# Altium PCB PCB1.PcbDoc (part 2 of 2)
Units mil, origin at the board's own origin, x right, y up, seen from the top; angles counter-clockwise.
Board outline 3150 x 1810 mil, 2 copper layers (Top Layer, Bottom Layer); 95 components, 64 nets, 312 pads, 221 vias.
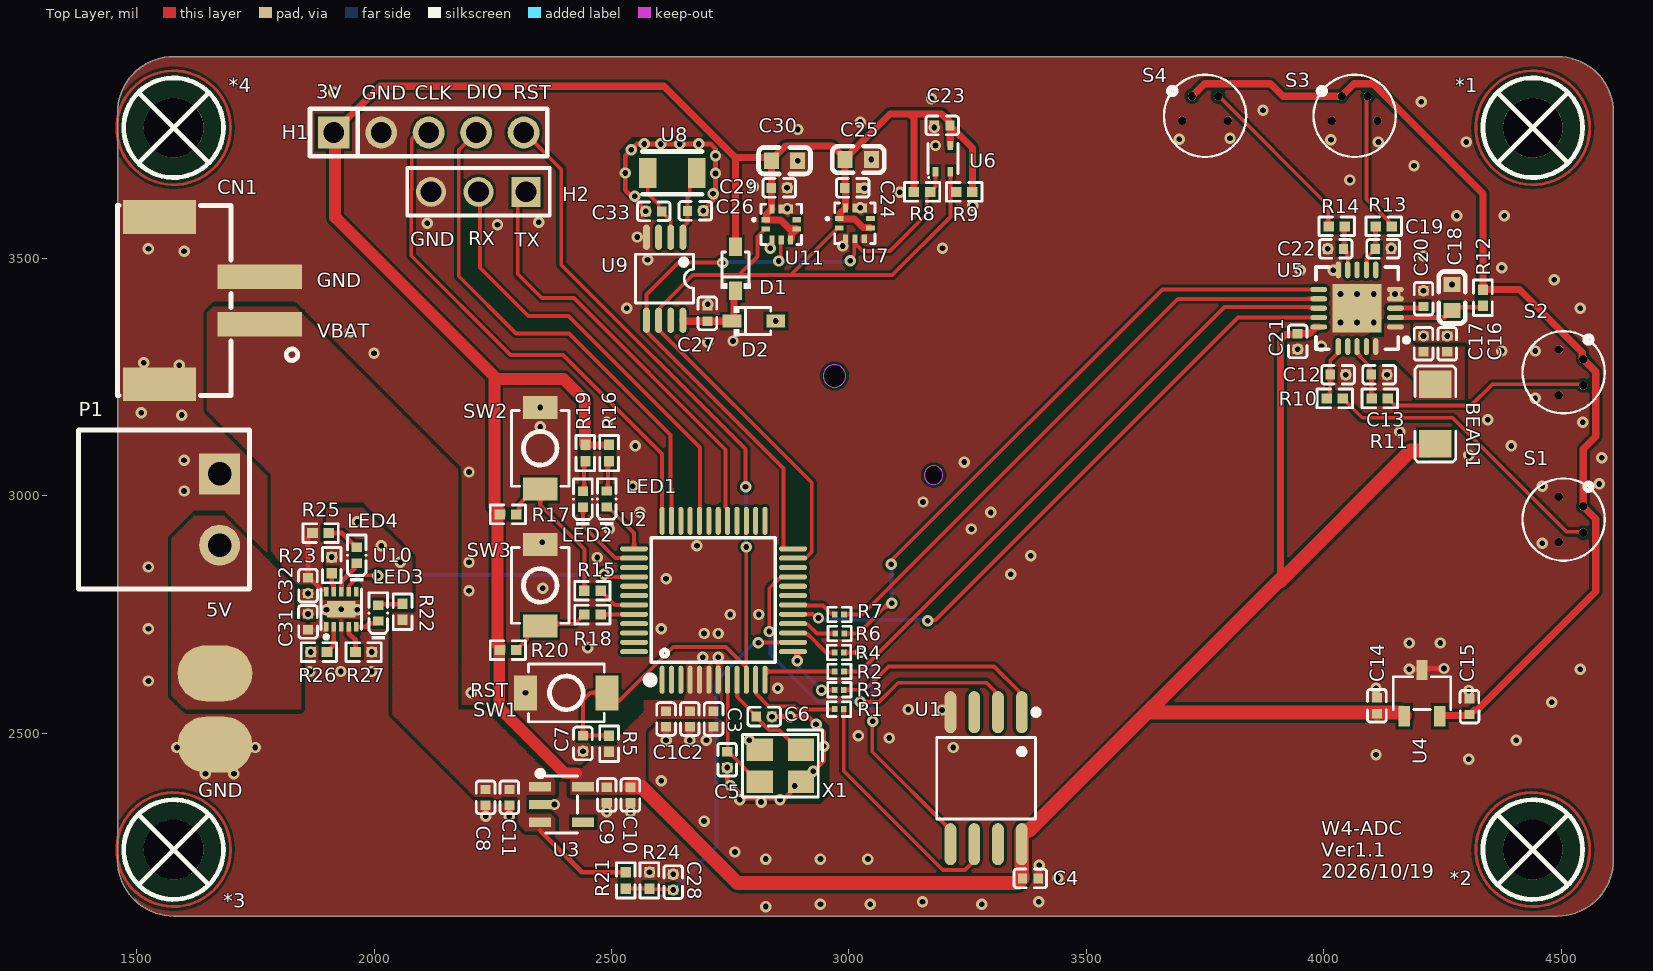
[diagram p0: Top Layer view]

## Via types
v1: diameter 24, hole 12, Top Layer to Bottom Layer, tented both sides, 221 vias

## Nets (pads, with @x,y where several pads share a name; then routed paths per layer and width w, separated by ;. In a path a pad name is that pad's centre, name@x,y a point inside that pad or via, vN(x,y) a via of type N, cw(c..) or ccw(c..) an arc to the next point about the centre after c; other vN are vias at no path point) (continued)
GND: (continued)
  Top Layer w10: v1(2235,2325) C8.2 ; v1(2285,2325) C11.2 ; v1(2490,2335) C9.2 ; v1(2540,2335) C10.2 ; v1(2572.46,3599) 2572.46,3599.79 2529,3643.25 2529,3716 v1(2541.5,3728.5) 2554,3741 v1(2569,3741) v1(2604,3741) v1(2644,3741) v1(2684,3741) 2709,3741 2719,3731 v1(2719,3716) v1(2719,3678.85) 2719,3626.71 2693.08,3600.79 v1(2693.08,3600) ; v1(2615,2485) C1.2 ; v1(2665,2485) C2.2 ; v1(2700,2485) 2700,2488.79 2709.37,2498.16 2709.37,2508.62 2714.21,2513.46 C3.2 ; U2.7 v1(2724.84,2659.84) ; v1(2743.78,2427.66) 2743.78,2399.78 2780.18,2363.38 2864.73,2363.38 2876.36,2375 2876.36,2379.38 2894.98,2398 X1.4 ; v1(2838.08,2535) 2914.54,2535 2947.26,2502.27 2947.26,2442.41 X1.4@2902.85,2398 ; C4.2 3399.68,2195.42 3399.68,2220.56 v1(3400.85,2221.73) ; v1(4110,2595) 4110,2576.21 C14.2 ; v1(4180,2635) 4204.84,2635 U4.3 4210.1,2636.3 v1(4253.16,2636.3) ; v1(4305,2590) 4305,2574.29 C15.1
  other v1: 2825,2135 2940,2140 3045,2140 3280,2140 3155,2145 3400,2145 3440,2195 2630,2203.08 2580,2207.04 2825,2235 2940,2235 3040,2235 2760,2250 2695,2315 2815,2355 2770,2360 2855,2360 2885.67,2388.69 2750,2390 2605,2400 1645,2415 1705,2415 2925.06,2420.2 4305,2445 4110,2455 2440,2461.92 1585,2470 1750,2470 3220,2470 2947.26,2472.34 2790,2485 4405,2485 3085,2490 3020,2495 2930.9,2518.64 2876.31,2535 3195.94,2548.94 3125,2550 4480,2565 2205,2585 2318.98,2585 2850,2595 1525,2610 1865,2630 1930,2630 1995,2630 4540,2635 2692.37,2659.81 1866.92,2671 1995.08,2671 2450,2680 4180,2690 4245,2690 2695,2710 2725,2710 1525,2720 2605,2720 2750,2750 2810,2750 1861,2751.12 1900,2760 1965,2760 1931,2761 1861,2794.36 2200,2800 2355,2805 2615,2825 3341,2835 1525,2850 2055,2860 2200,2860 2470,2870 1911,2871 3383,2874 2015,2895 2680,2895 4460,2900 2354.51,2902.25 2495,2930 3258,2930 1965,2945 2560,2965 3299,2965 3156,2987 1600,3010 2545,3020 4460,3020 4580,3025 2200,3050 3243,3071 1600,3075 4585,3080 4305,3085 2550,3105 4395,3105 4160,3135 2350,3145 2490,3155 4545,3155 4345,3160 1595,3170 1510,3175 2350,3186.02 4445,3205 4046.54,3255 4133.08,3255 1590,3275 1515,3280 2000,3300 4375,3305 4445,3305 3945,3308.46 3995,3315 2703,3323 2756,3326 4210,3336.54 4260,3336.54 1950,3345 4035,3365 4070,3365 4105,3365 2532,3395 4540,3395 2702.51,3403.45 4035,3425 4070,3425 4105,3425 4150,3425 4210,3431.54 4270,3445.12 4485,3455 3950,3475 4020,3475 4375,3480 2576,3497 4210,3505 1600,3515 1525,3520 4008.46,3520 2834.6,3521.23 3197,3521 4142.16,3520.86 2987,3526 2554,3545 2260,3571 2112,3574 2347,3576 4280,3590 4380,3590 2870,3604.85 3023.75,3606.66 3261,3611 2549,3631 2714,3636 3107,3639 2869.81,3648.43 3032.68,3647.88 2799,3651 4055,3665 2529,3679.62 4190,3695 2892.09,3705.69 3047.24,3707.99 3182.25,3737.56 4115,3745 4300,3745 4015,3750 3695.94,3750.88 3802.53,3752.71 2892.44,3771.41 3179.61,3775.53 3024,3787 3872,3812 4205,3830 3174,3836 1915,3850
IN0: C12.1 R10.2 U5.16 | length 119.8
  Top Layer w8: R10.2 4006.43,3205 4013.46,3212.04 C12.1 4013.46,3284.92 4030.63,3302.09 U5.16
IN1: C13.1 R11.2 U5.18 | length 122.1
  Top Layer w8: U5.18 4070.58,3313.71 4070.58,3299.25 4096.88,3272.94 4096.88,3258.12 4100.46,3254.54 4100.46,3205.46 R11.2
IN2: C19.1 R13.2 U5.7 | length 100.3
  Top Layer w8: U5.7 4090.26,3476.29 4090.26,3501.88 4099.21,3510.83 4100.07,3510.83 4108.46,3519.21 C19.1 4108.87,3520.41 4108.87,3566.98 R13.2
IN3: C22.1 R14.2 U5.9 | length 97.5
  Top Layer w8: R14.2 4042.9,3566.03 4042.9,3521.36 C22.1 4041.54,3519.21 4047.38,3513.37 4049.19,3513.37 4050.31,3512.25 U5.9
LED1: LED1.1 U2.37 | length 113.7
  Top Layer w8: LED1.1 2495.84,2970.69 2498.49,2970.69 2547.68,2921.5 U2.37
LED2: LED2.1 U2.38 | length 175.1
  Top Layer w8: LED2.1 2439.96,2937.06 2507.94,2869.08 2547.18,2869.08 U2.38
NetBEAD1_2: BEAD1.2 C16.1 C17.1 U5.1 U5.20
NetC5_1: C5.1 U2.8 X1.3 | length 247.4
  Top Layer w8: U2.8 2744.76,2612.45 2744.76,2464.64 2744.76,2461.73 C5.1 2749.62,2454.9 2752.18,2454.9 2774.25,2432.83 2774.25,2432.1 2808.36,2398 X1.3
NetC6_2: C6.2 U2.9 X1.1 | length 218.4
  Top Layer w8: U2.9 2764.71,2612.18 2764.71,2576.07 2805,2535.79 C6.2 2810.84,2529.16 2810.84,2527.62 2832.38,2506.09 2853.82,2506.09 2894.98,2464.93 X1.1
NetC26_1: C26.1 U8.2 U9.1 | length 147.6
  Top Layer w8: U9.1 2650.39,3565.48 2660,3575.09 C26.1 2660,3627.17 2664.8,3631.97 2664.8,3665.3 U8.2
NetC27_1: C27.1 D1.1 D2.1 U9.8 | length 172.8
  Top Layer w8: D2.1@2753.3,3367.46 D2.1@2757.84,3372 ; D1.1@2757.84,3428.52 D1.1
  Top Layer w15: U9.8 2650.39,3367.68 2650.61,3367.46 C27.1 D2.1@2753.3,3367.46 ; D2.1@2757.84,3372 D1.1@2757.84,3428.52
NetC33_2: C33.2 U8.1 U9.2 | length 156.1
  Top Layer w8: U8.1 2576.5,3636.5 2599.7,3613.31 2599.7,3604.84 C33.2 2605.54,3598.21 2618.35,3585.41 2619.13,3585.41 2624.79,3579.75 U9.2
NetD2_2: D2.2 U12.1
  other v1: 2846.16,3368
NetLED1_2: LED1.2 R16.1 | length 65
  Top Layer w8: LED1.2 2492.5,3012.5 2492.5,3070.46 R16.1
NetLED2_2: LED2.2 R19.1 | length 65.6
  Top Layer w8: LED2.2 2442.48,3012.02 2442.48,3070.44 R19.1
NetLED3_1: LED3.1 U10.5 | length 51.4
  Top Layer w10: U10.5 1983.09,2724.48 1990.04,2731.43 2004.16,2731.43 LED3.1
NetLED3_2: LED3.2 R22.1 | length 52.4
  Top Layer w10: LED3.2 2010.63,2771.36 2058.36,2771.36 R22.1
NetLED4_1: LED4.1 U10.8 | length 74.4
  Top Layer w10: U10.8 1931.34,2797.86 1931.34,2819.41 1957.92,2845.99 1957.92,2853.16 1962.76,2858 LED4.1
NetLED4_2: LED4.2 R25.1 | length 71.5
  Top Layer w10: R25.1 1932.65,2921.58 1962.76,2891.47 LED4.2
NetR1_2: R1.2 U2.11 | length 209.9
  Top Layer w8: U2.11 2804.08,2612.18 2804.08,2583.38 2830.46,2557 2885.42,2557 2892.72,2549.7 2968.84,2549.7 R1.2
NetR2_2: R2.2 U2.12 | length 163.8
  Top Layer w8: U2.12 2823.27,2628.79 2824.48,2630 R2.2
NetR3_2: R3.2 U2.13 | length 137.6
  Top Layer w8: U2.13 2889.92,2671.73 2891.13,2670.52 v1(2891.13,2652.51) ; v1(2942.31,2590.94) R3.2@2969.79,2590.94
  Bottom Layer w8: v1(2891.13,2652.51) 2894.19,2649.45 2894.19,2639.05 v1(2942.31,2590.94)
NetR4_2: R4.2 U2.15 | length 104.7
  Top Layer w8: U2.15 2882.82,2710.6 2911.44,2710.6 2952.03,2670 R4.2
NetR6_2: R6.2 U2.16 | length 97.3
  Top Layer w8: U2.16 2882.82,2730.29 2912.32,2730.29 2932.61,2710 R6.2
NetR7_2: R7.2 U2.18 | length 96.8
  Top Layer w8: U2.18 2882.82,2769.66 2908.9,2769.66 2909.7,2768.85 2945.18,2768.85 2961.65,2752.38 2968.52,2752.38 2970.49,2750.41 R7.2
NetR10_1: R10.1 S1.4 | length 623.4
  Top Layer w8: R10.1 4040.51,3205 4081.14,3164.36 4271.02,3164.36 4511.14,2924.24 4544.54,2924.24 S1.4
NetR11_1: R11.1 S2.4 | length 437.4
  Top Layer w8: R11.1 4135.51,3205 4142.14,3198.37 4142.14,3197.86 4150.11,3189.89 4310.19,3189.89 4355.06,3234.76 4544.02,3234.76 S2.4
NetR13_1: R13.1 S3.4 | length 297.5
  Top Layer w8: S3.4 4089.9,3838.68 4089.9,3625.14 4136.22,3578.82 4136.22,3574.02 4142.85,3567.39 R13.1
NetR14_1: R14.1 S4.4 | length 370.7
  Top Layer w8: S4.4 3779.09,3841.34 4009.49,3610.93 R14.1@4009.49,3567.58
NetR15_1: R15.1 R17.2 SW2.2 | length 334.4
  Top Layer w8: R17.2 2299.59,2960.67 2306.22,2967.3 2306.22,2982.6 2337.6,3013.98 SW2.2 2350,2980.53 2442.96,2887.57 R15.1
NetR18_1: R18.1 R20.2 SW3.2 | length 179.5
  Top Layer w8: R20.2 2299.59,2675 2321.89,2697.31 2321.89,2705.11 2342.11,2725.32 SW3.2 2354.89,2730.21 2422.67,2730.21 2442.45,2750 R18.1
NetR23_1: R23.1 U10.9 | length 41.2
  Top Layer w10: R23.1 1911,2815.93 1914.91,2812.02 1914.91,2797.86 U10.9
NetR26_2: R26.2 U10.2 | length 59.7
  Top Layer w10: R26.2 1901.51,2671 1907.13,2676.63 1907.13,2677.14 1915.25,2685.25 U10.2
NetR27_2: R27.2 U10.4 | length 59.7
  Top Layer w10: U10.4 1947.09,2724.14 1947.09,2709.98 1953.53,2703.54 1954.09,2703.54 1961,2696.63 R27.2
NRST: C7.2 H1.5 R5.1 SW1.2 U2.10 | length 1899.3
  Top Layer w8: H1.5 2316.85,3765 2394.42,3687.43 2394.42,3486.22 2782.43,3098.22 v1(2782.43,3018.74) ; R5.1 C7.2 2440,2570.19 2454.81,2585 SW1.2 2507.04,2568.98 2517.16,2568.98 2630.02,2681.84 2740.92,2681.84 U2.10@2783.4,2639.36 ; v1@2783,2893 v1(2783.73,2892.27) 2783.73,2639.36 2783.74,2612.84 U2.10
  Bottom Layer w8: v1(2782.43,3018.74) 2783.08,3018.09 2783.08,2892.92 v1(2783.73,2892.27)
PA8: U2.28
PB0: U2.19
PB1: U2.20
PB4: R15.2 U2.43 | length 83.3
  Top Layer w8: R15.2 2477.55,2800 2484.18,2793.37 2484.18,2792.86 2506.88,2770.16 U2.43
PB5: R18.2 U2.44 | length 70.8
  Top Layer w8: R18.2 2477.28,2750.24 2547.45,2750.24 U2.44
PB11: R9.2 U2.23 U6.2 U7.2 U9.6 U11.2 | length 1756.1
  Top Layer w8: U11.2 2823.78,3561.7 2807.61,3545.53 2807.61,3504.22 2768.2,3464.81 ; 2877.65,3465.18 2974.68,3562.21 2974.68,3562.48 2976.2,3563.99 U7.2 ; U2.23 2882.82,2869.08 2909,2869.08 2921.85,2881.93 2921.85,3027.65 2599.2,3350.3 U9.6 2599.2,3390.66 2602.48,3393.94 2602.48,3396.03 2671.26,3464.81 2765.08,3464.81 2768.2,3464.81 ; U6.2 3213.75,3640 ; R9.2 3213.75,3640 ; 2768.2,3464.81 3091.36,3464.81 3213.75,3587.2 3213.75,3640
PB12: R8.2 U2.24 U6.1 U7.4 U9.5 U11.4 | length 1524.1
  Top Layer w8: v1(2734,3491) 2641,3491 2573.61,3423.61 2573.61,3348.53 2576.89,3345.25 2576.89,3342.73 2862.11,3057.52 2862.11,2889.48 2863.32,2888.27 U2.24 ; v1@2856.6,3494.93 2856.6,3537.91 U11.4 ; v1(3002.53,3495.05) 3002.53,3495.67 3000.78,3497.42 3011.09,3507.74 3011.09,3530.43 3011.09,3539.55 U7.4 ; 3014.12,3530.43 3029.08,3515.47 3086.27,3515.47 3163.91,3593.1 3163.91,3633.37 3170.53,3640 R8.2@3176.65,3640 ; R8.2 3171.55,3640 3174.1,3642.55 3182.25,3650.7 U6.1@3182.25,3682.44
  Bottom Layer w8: v1(2734,3491) 2735.11,3492.11 2850.35,3492.11 v1(2852.57,3494.32) 2854.73,3492.17 v1@3006.1,3492.17
PB15: U2.27
PD2: U2.40 U10.7 | length 626.5
  Top Layer w8: U10.7 1947.16,2797.93 1947.16,2810.67 1969.18,2832.69 v1@2008.47,2832.69 ; v1(2485,2835) 2489.33,2835 2495.12,2829.21 U2.40
  Bottom Layer w8: v1@2008.04,2833.2 2483.2,2833.2 v1(2485,2835)
  other v1: 2008.04,2831.93
REF: C18.1 R12.1 U5.2 | length 194.5
  Top Layer w10: U5.2 4253.35,3375.32 4268.03,3390 C18.1 4277.14,3397.14 4332.14,3397.14 R12.1
REFIN: C20.1 U5.3 | length 60.7
  Top Layer w10: U5.3 4150.91,3395.2 4206.74,3395.2 C20.1
SCK: R2.1 U5.13 | length 1318.7
  Top Layer w8: R2.1 3023.42,2630 3790.9,3397.47 3973.79,3397.47 3976.27,3395 U5.13
SDO: U2.17 U5.14 | length 1377.4
  Top Layer w8: U2.17@2882.64,2750.79 2923.41,2750.79 2931.6,2742.6 v1(2935.93,2742.6) ; v1@3167.77,2735.49 3170.49,2738.21 3182.41,2738.21 3819.52,3375.32 U5.14
  Bottom Layer w8: v1(2935.93,2742.6) 2938.99,2739.54 2948.01,2739.54 2948.61,2738.94 3162.11,2738.94 v1@3166.66,2734.38
  other v1: 3165.97,2736.71
SWCLK: H1.3 U2.36 | length 1127
  Top Layer w8: H1.3 2085.86,3758.58 2083.59,3756.31 2079.52,3749.95 2079.52,3649.15 ccw(c2120,3640) 2078.5,3639.73 2078.5,3505.41 2287.35,3296.56 2398.22,3296.56 2606.73,3088.05 U2.36
SWDIO: H1.4 U2.35 | length 1083.7
  Top Layer w8: H1.4 2178.5,3728.5 2178.5,3462.24 2298.77,3341.97 2410.29,3341.97 2624.1,3128.17 2624.1,3016.65 2626.42,3014.32 U2.35
USART1_RX: H2.2 U2.32 | length 935.8
  Top Layer w8: H2.2 2223.35,3636.65 2223.35,3480.1 2324.76,3378.69 2409.41,3378.69 2686.34,3101.76 2686.34,2974.26 2685.97,2973.9 2685.97,2947.82 U2.32
USART1_TX: H2.1 U2.29 | length 922.4
  Top Layer w8: H2.1 2302.74,3622.74 2302.74,3466.82 2353.19,3416.37 2420.81,3416.37 2740.26,3096.93 2740.26,2976.52 2744.53,2972.24 U2.29
VBAT: C8.1 C11.1 C32.2 CN1.1 R21.2 R22.2 R25.2 U3.1 U3.3 U10.10 | length 367.1
  Top Layer w10: R25.2 1869.92,2921.58 1864.29,2915.95 1864.29,2915.45 1861,2912.15 C32.2 1865.84,2822.6 1869.11,2822.6 1889.25,2802.46 U10.10@1898.91,2802.46 ; 2350,2295 2437.96,2207.04 R21.2
  Top Layer w15: C8.1@2231.87,2379.2 2232.66,2379.2 C8.1
pads on no net: *1.1 *2.1 *3.1 *4.1 U1.3 U1.7 U2.1 U2.2 U2.3 U2.22 U2.25 U2.26 U2.30 U2.31 U2.33 U2.34 U2.39 U2.41 U2.42 U2.45 U2.46 U2.47 U2.48 U3.4 U5.6 U5.8 U5.17 U5.19 U7.7 U9.3 U9.7 U10.6 U11.7
copper on no net: | length 6031.9
  Top Layer w6: 1698,2255 ccw(c1578,2255) 1698,2255 ; 1698,3775 ccw(c1578,3775) 1698,3775 ; 4560,2255 ccw(c4440,2255) 4560,2255 ; 4560,3775 ccw(c4440,3775) 4560,3775
  Bottom Layer w6: 1698,2255 ccw(c1578,2255) 1698,2255 ; 1698,3775 ccw(c1578,3775) 1698,3775 ; 4560,2255 ccw(c4440,2255) 4560,2255 ; 4560,3775 ccw(c4440,3775) 4560,3775

## Polygon pours and split planes (outlines as drawn)
GND on Top Layer "NONET_L-01_P-001" (solid, remove dead copper, pour order 14): 1460,2233.11 1460,3806.89 cw(c1578.11,3806.89) 1578.11,3925 4491.89,3925 cw(c4491.89,3806.89) 4610,3806.89 4610,2233.11 cw(c4491.89,2233.11) 4491.89,2115 1578.11,2115 cw(c1578.11,2233.11)
VBAT on Top Layer "NONET_L-01_P-001" (hatched Horizontal grid 4 track 5, remove dead copper, pour order 11): 1840,2810 1890,2810 1890,2980 1885,2985 1980,2985 2090,2875 2090,2755 2040,2755 2040,2540 2220,2360 2305,2360 2305,2310 2320,2295 2380,2295 2380,2320 2370,2330 2325,2330 2325,2365 2380,2365 2380,2400 2230,2550 2175,2550 2175,3055 1830,3400 1665,3400 1650,3385 1650,3180 1785,3045 1785,2885
5V on Top Layer "NONET_L-01_P-001" (hatched Horizontal grid 4 track 5, remove dead copper, pour order 10): 1905,2740 1840,2740 1835,2735 1830,2740 1830,2810 1680,2960 1625,2960 1575,2910 1575,2580 1605,2550 1845,2550 1845,2673.06 1905,2716.39
NetBEAD1_2 on Top Layer "NONET_L-01_P-001" (hatched Horizontal grid 4 track 5, remove dead copper, pour order 5): 4100,3340 4100,3285 4155,3285 4195,3245 4195,3200 4295,3200 4295,3315 4190,3315 4180,3325 4180,3365 4130,3365 4125,3370 4125,3340
3V on Top Layer "NONET_L-01_P-001" (hatched Horizontal grid 4 track 5, remove dead copper, pour order 0): 2415,2370 2570,2370 2570,2505 2595,2530 2720,2530 2720,2645 2655,2645 2655,2570 2570,2570 2570,2545 2500,2475 2465,2475 2465,2450 2440,2425 2415,2425
GND on Bottom Layer "NONET_L-01_P-001" (solid, remove dead copper, pour order 15): 1460,2233.11 1460,3806.89 cw(c1578.11,3806.89) 1578.11,3925 4491.89,3925 cw(c4491.89,3806.89) 4610,3806.89 4610,2233.11 cw(c4491.89,2233.11) 4491.89,2115 1578.11,2115 cw(c1578.11,2233.11)

## Other copper
Top Layer:
  pour cut-out: 2564,3596 2519,3641 2519,3721 2514,3726 2544,3756 2704,3756 2724,3736 2729,3736 2729,3621 2694,3586 2694,3581 2574,3581 2569,3586
  pour cut-out: 2720,2485 2720,2400 2775,2350 2780,2350 2940,2350 2965,2375 2960,2380 2960,2515 2919.07,2555.93 2784.86,2555.93

## Silkscreen, mask and mechanical layers (free items; w line width, h text height)
Top Overlay:
  text "3V" at 1878,3836 h30
  text "DIO" at 2194,3836 h30
  text "RST" at 2293,3835 h30
  text "GND" at 1974,3834 h30
  text "CLK" at 2086,3834 h30
  text "RX" at 2198,3528 h30
  text "GND" at 2076,3525 h30
  text "TX" at 2296,3524 h30
  text "GND" at 1879,3439 h30
  text "VBAT" at 1880,3333 h30
  text "5V" at 1646.64,2744.88 h30
  text "RST" at 2203.17,2575.49 h30
  text "GND" at 1630,2365 h30
  text "W4-ADC / Ver1.1 / 2026/10/19" at 3995,2195 h30
Mechanical 1:
  the board outline again, w10